# Altium PCB PairsXSignals.PcbDoc
Units mil, origin at the board's own origin, x right, y up, seen from the top; angles counter-clockwise.
Board outline 2000 x 1200 mil, 2 copper layers (Top Layer, Bottom Layer); 5 components, 9 nets, 19 pads, 0 vias.
Unrouted connection lines stored in the file: 4.
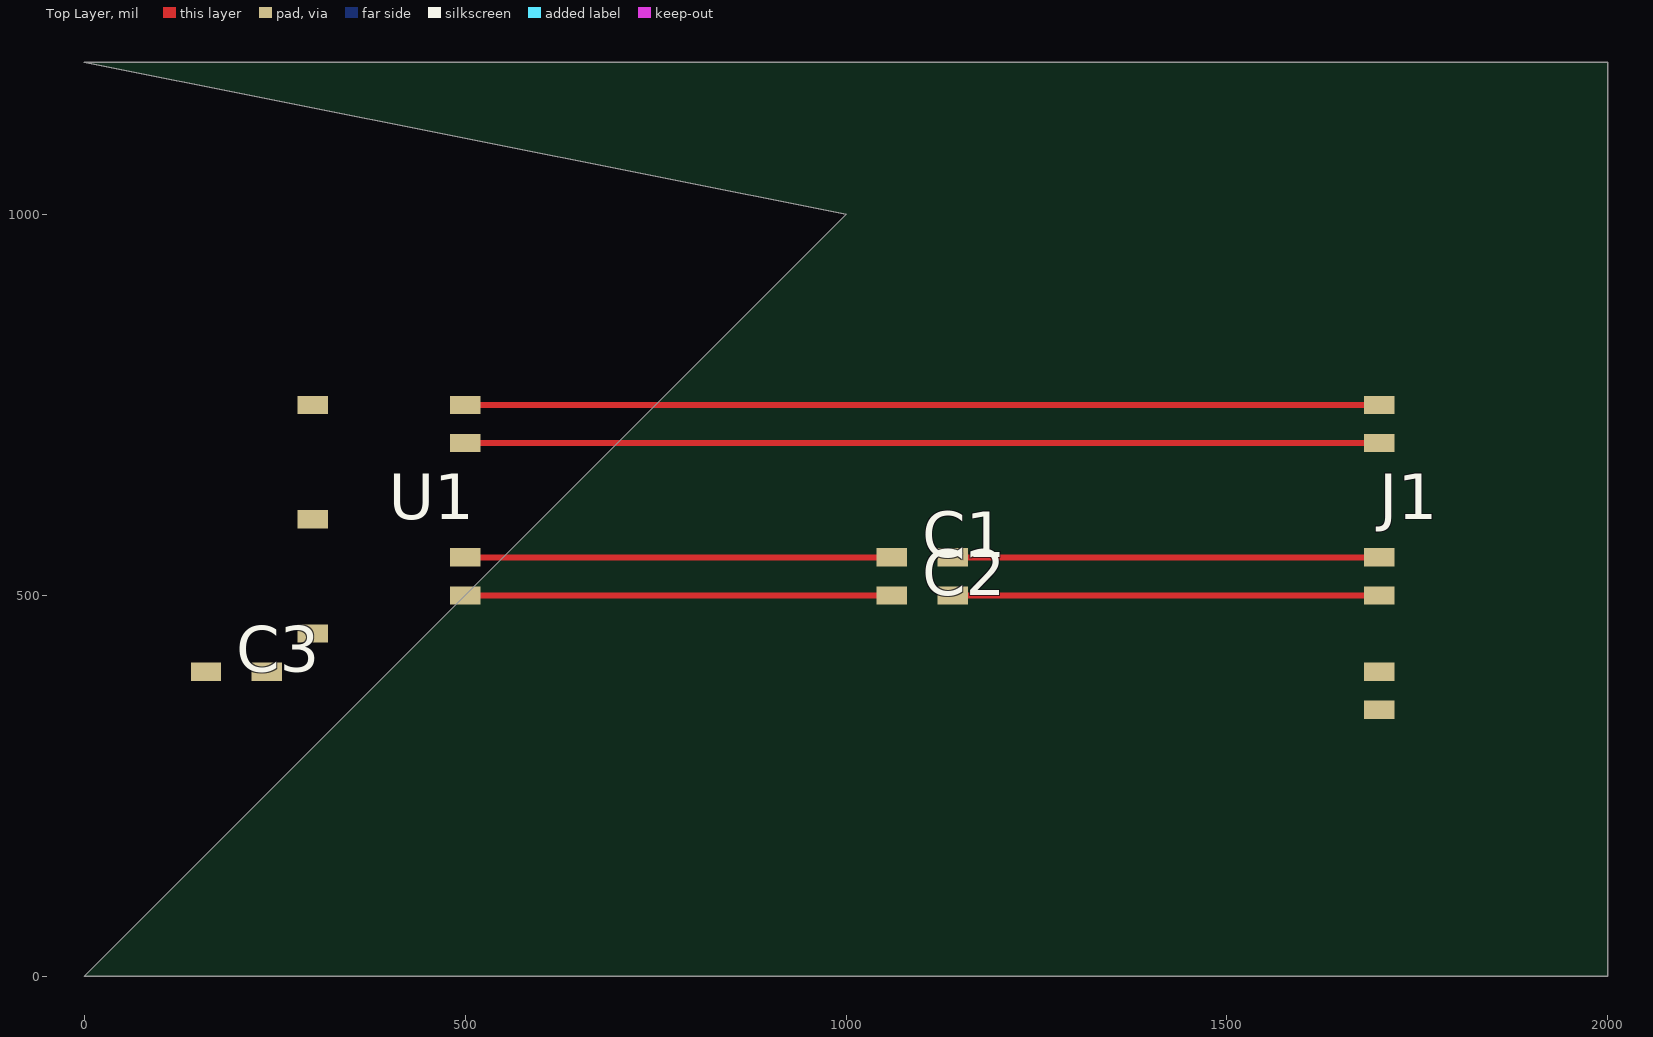
[diagram p0: Top Layer view]
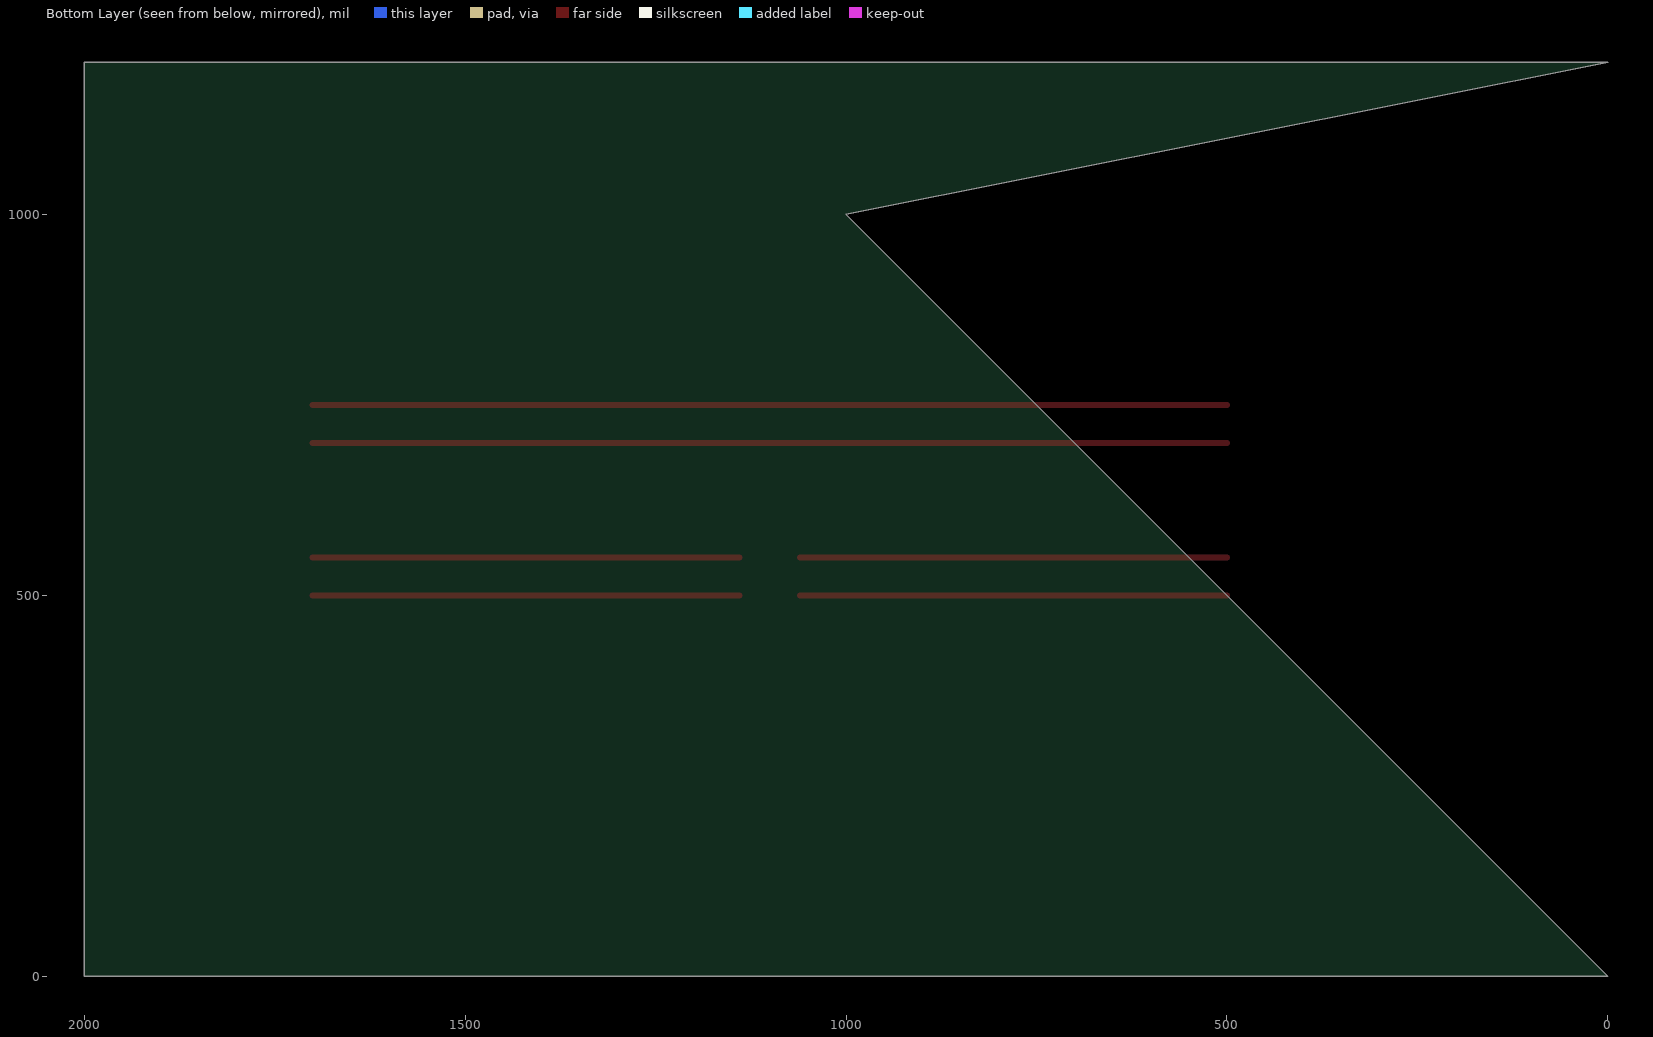
[diagram p1: Bottom Layer view, seen from below]

## Layer stack, top to bottom
Top Solder: solder mask 0.4, Solder Resist, Dk 3.5
Top Layer: signal copper 1.4
Dielectric 1: dielectric 12.6, FR-4, Dk 4.8
Bottom Layer: signal copper 1.4
Bottom Solder: solder mask 0.4, Solder Resist, Dk 3.5

## Board outline
0,0 2000,0 2000,1200 0,1200 1000,1000

## Design rules (kind name [scope] priority, off if disabled: settings)
Clearance [All] p1: gap=10 ignorepadtopadclearanceinfootprint=FALSE
DiffPairsRouting HS_DiffPairs [InDifferentialPairClass('HS_PAIRS')] p1: maxlimit=10 minlimit=10 mostfreqgap=10 toplayer_minwidth=15 toplayer_maxwidth=15 toplayer_prefwidth=15 bottomlayer_minwidth=15 bottomlayer_maxwidth=15 bottomlayer_prefwidth=15 maxuncoupledlength=500
DiffPairsRouting [All] p2: maxlimit=10 minlimit=10 mostfreqgap=10 toplayer_minwidth=15 toplayer_maxwidth=15 toplayer_prefwidth=15 bottomlayer_minwidth=15 bottomlayer_maxwidth=15 bottomlayer_prefwidth=15 maxuncoupledlength=500
MatchedLengths PCIE_TX_MatchedLength [InxSignalClass('PCIE_TX_XSIGNALS')] p1: tolerance=10 checknetsindiffpair=FALSE checkdiffpairvsdiffpair=TRUE checkxsignals=TRUE checkothers=TRUE // Atrium fixture: matched length within xSignal class
PolygonConnect [All] p1: connectstyle=Relief reliefconductorwidth=10 reliefentries=4 polygonreliefangle="90 Angle" airgapwidth=10
RoutingVias [All] p1: holewidth=28 width=50 viastyle="Through Hole" minholewidth=28 minwidth=50 maxholewidth=28 maxwidth=50
SolderMaskExpansion [All] p1: expansion=0 istentingtop=FALSE
Width [All] p1: maxlimit=10 minlimit=10 preferedwidth=10
29 further rules are at their usual default settings.

## Classes and differential pairs
differential pair class HS_PAIRS: PCIE_TX USB
net class POWER: +3V3 GND
net class HS_NETS: PCIE_TX_C_N PCIE_TX_C_P PCIE_TX_N PCIE_TX_P USB_DM USB_DP
differential pair PCIE_TX: +PCIE_TX_P -PCIE_TX_N
differential pair USB: +USB_DP -USB_DM

## Components (designator, comment, footprint, x,y, rotation, side; value= is the part's Value field where it differs from the comment)
C1 "100nF" ATRIUM_0402 1100,550 r0 top
C2 "100nF" ATRIUM_0402 1100,500 r0 top
C3 "1uF" ATRIUM_0402 200,400 r0 top
J1 "EDGE" ATRIUM_CONN6 1700,600 r0 top
U1 "HOST" ATRIUM_QFN8 400,600 r0 top

## Footprints (in the part's own frame and the unit in brackets; to place one, negate y for a bottom-side part, rotate by r counter-clockwise, add the part's x,y. Pads: shape width x height; smd on the part's side, far side on the other; paste and mask are expansions set on the pad)
ATRIUM_0402 [mil]
  rect 40x24 smd: 1(-40,0) 2(40,0)
ATRIUM_CONN6 [mil]
  rect 40x24 smd: 1(0,150) 2(0,100) 3(0,-50) 4(0,-100) 5(0,-200) 6(0,-250)
ATRIUM_QFN8 [mil]
  rect 40x24 smd: 1(100,150) 2(100,100) 3(100,-50) 4(100,-100) 5(-100,150) 6(-100,0) 7(-100,-150)

## Nets (pads, with @x,y where several pads share a name; then routed paths per layer and width w, separated by ;. In a path a pad name is that pad's centre, name@x,y a point inside that pad or via, vN(x,y) a via of type N, cw(c..) or ccw(c..) an arc to the next point about the centre after c; other vN are vias at no path point)
+3V3: C3.1 U1.7
CLK: J1.5 U1.5
GND: C3.2 J1.6 U1.6
PCIE_TX_C_N: C2.2 J1.4 | length 560
  Top Layer w8: C2.2 J1.4
PCIE_TX_C_P: C1.2 J1.3 | length 560
  Top Layer w8: C1.2 J1.3
PCIE_TX_N: C2.1 U1.4 | length 560
  Top Layer w8: U1.4 C2.1
PCIE_TX_P: C1.1 U1.3 | length 560
  Top Layer w8: U1.3 C1.1
USB_DM: J1.2 U1.2 | length 1200
  Top Layer w8: U1.2 J1.2
USB_DP: J1.1 U1.1 | length 1200
  Top Layer w8: U1.1 J1.1